# Altium PCB PCB_test_pcb_2_2026-10-20.pcbdoc
Units mm, origin at the board's own origin, x right, y up, seen from the top; angles counter-clockwise.
Board outline 59.65 x 48.65 mm, 2 copper layers (Top Layer, Bottom Layer); 8 components, 5 nets, 17 pads, 0 vias.
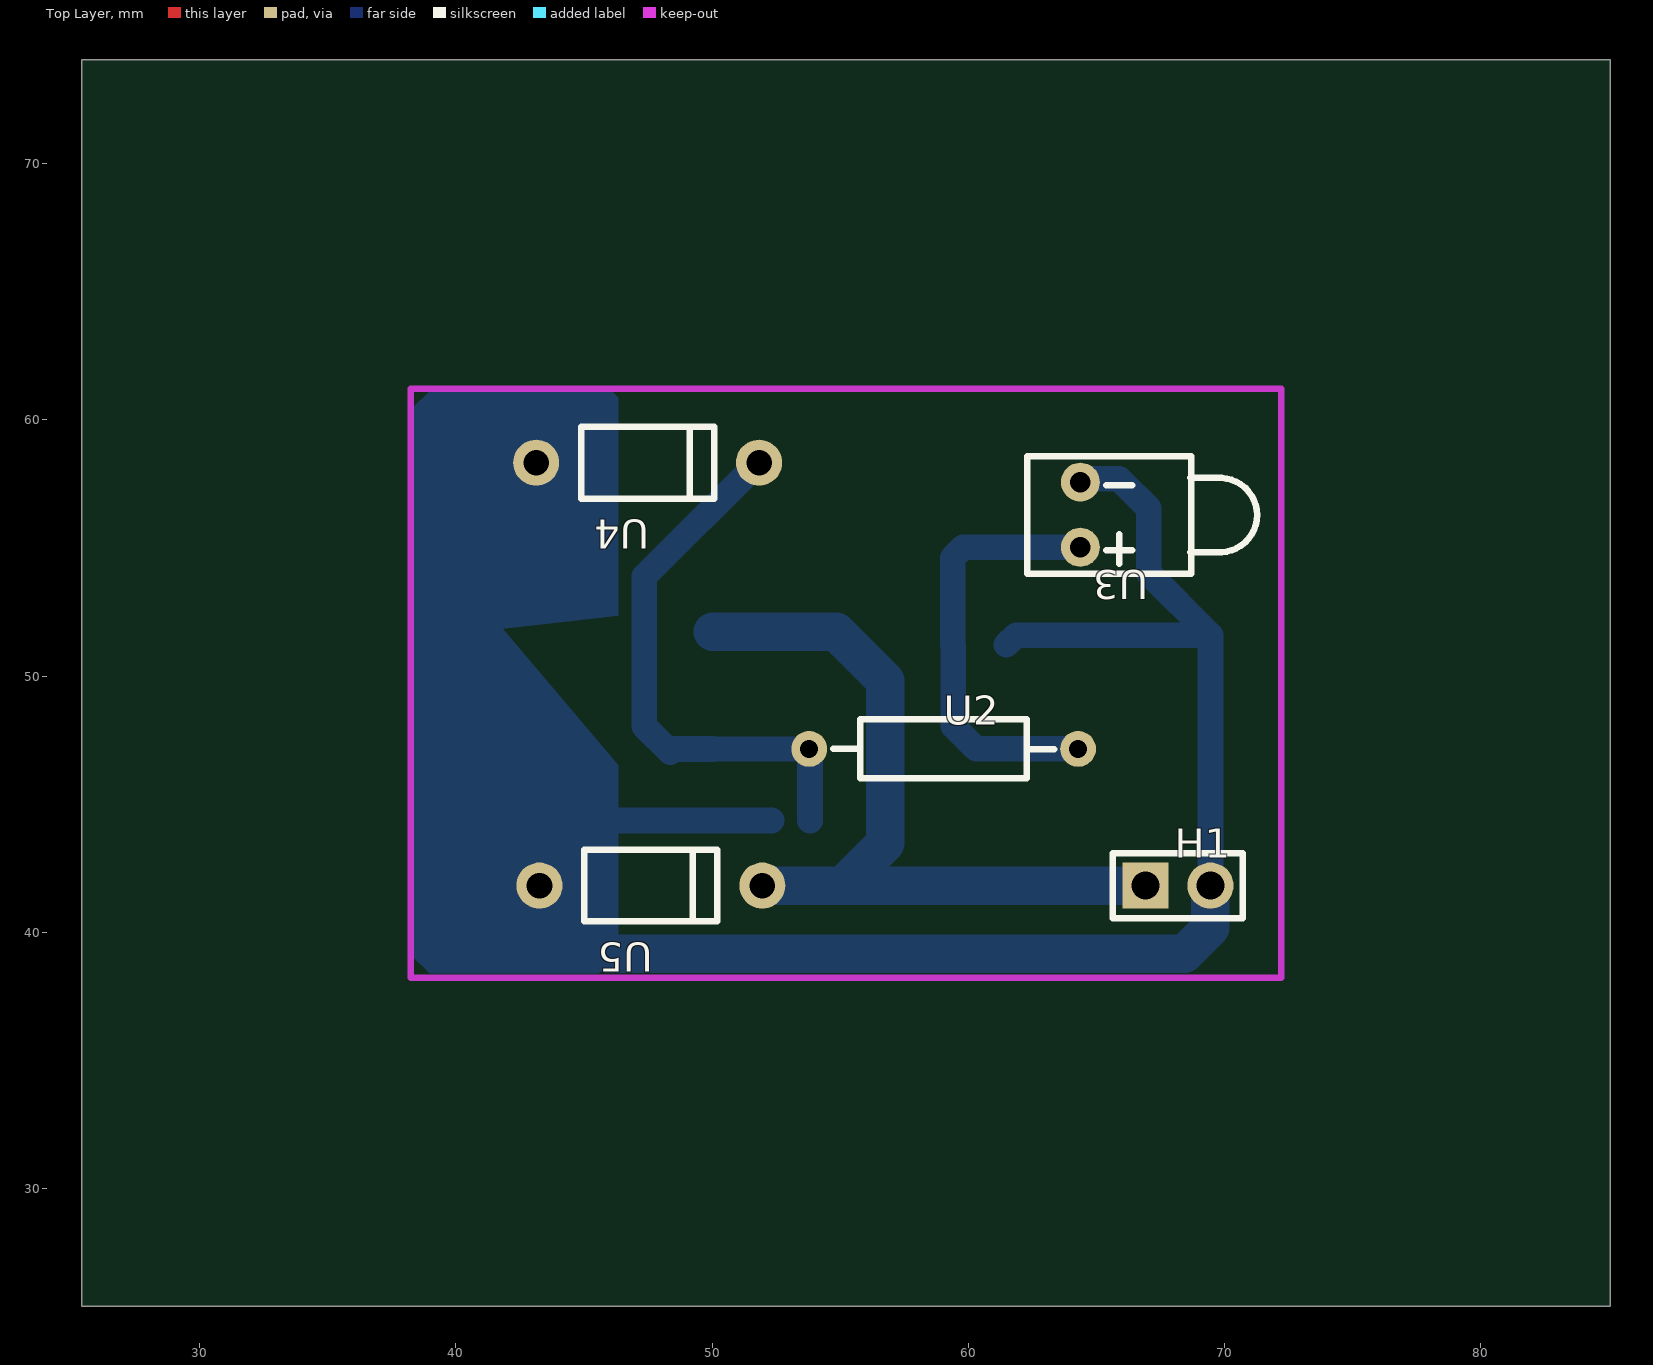
[diagram p0: Top Layer view]
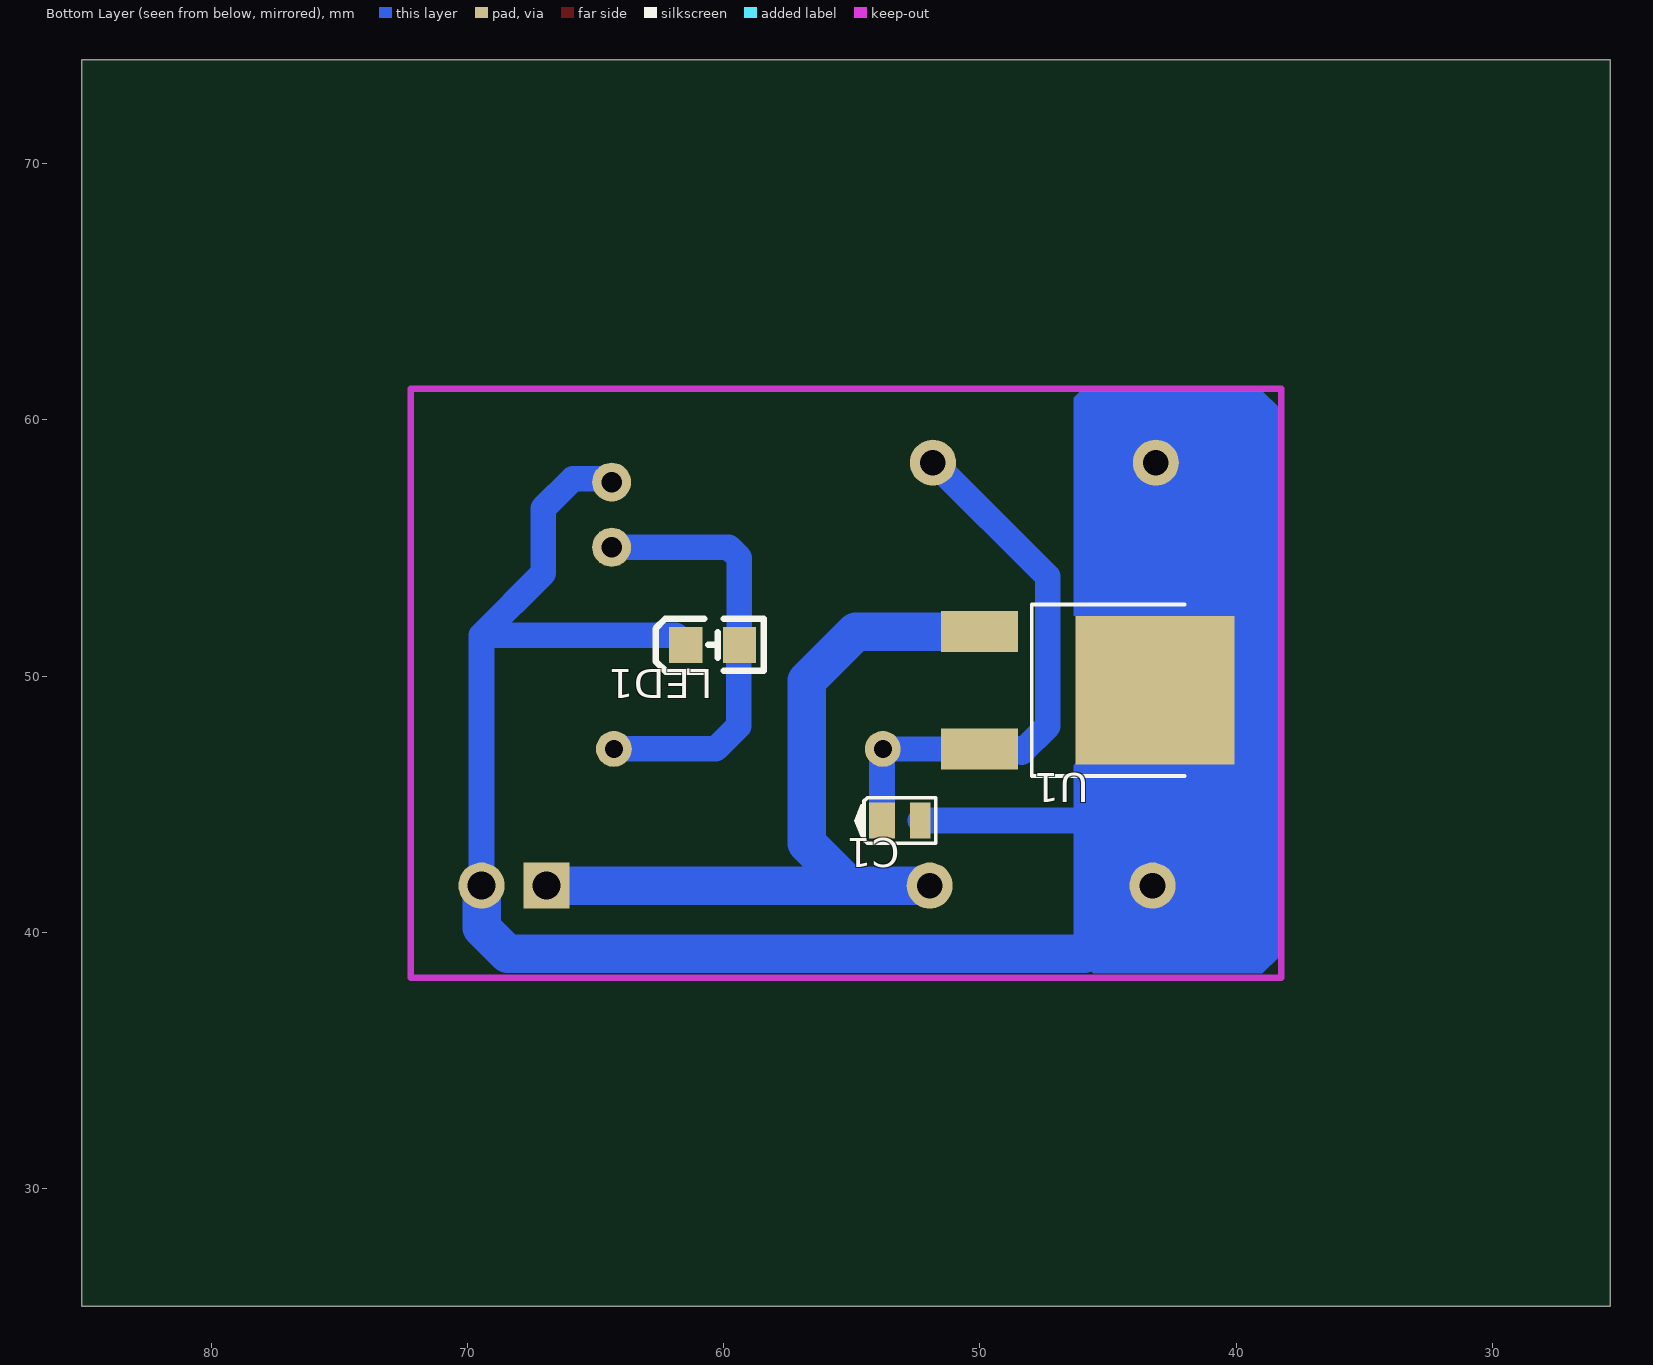
[diagram p1: Bottom Layer view, seen from below]

## Layer stack, top to bottom
Top Layer: signal copper (thickness not stored)
Dielectric: dielectric 0.32, FR-4, Dk 4.8
Bottom Layer: signal copper (thickness not stored)

## Board outline
85.054,25.4 25.4,25.4 25.4,74.054 85.054,74.054

## Components (designator, comment, footprint, x,y, rotation, side; value= is the part's Value field where it differs from the comment)
C1 "100nF" CAP-SMD_L2.2-W1.3-RD 53.071,44.363 r180 bottom
H1 "210S-1*2P L=11.6MMGold-plated black" HDR-TH_2P-P2.54-V-M-1 68.184,41.823 r0 top
LED1 "YLED0805O" LED0805-FD-GREEN 60.437,51.221 r180 bottom
U1 "7805_C19626525" TO-252-2_L6.6-W6.1-P4.57-LS9.9-BR-CW 46.594,49.443 r180 bottom
U2 "330mΩ" RES-TH_BD2.3-L6.5-P10.50-D0.5 59.04,47.157 r0 top
U3 "LED05-红灯" LED-TH_LED-3MM_RED 64.374,56.301 r180 top
U4 "1N4007A" DO-41_BD2.4-L4.7-P8.70-D0.9-RD 47.483,58.333 r180 top
U5 "1N4007A" DO-41_BD2.4-L4.7-P8.70-D0.9-RD 47.61,41.823 r180 top

## Footprints (in the part's own frame and the unit in brackets; to place one, negate y for a bottom-side part, rotate by r counter-clockwise, add the part's x,y. Pads: shape width x height; smd on the part's side, far side on the other; paste and mask are expansions set on the pad)
CAP-SMD_L2.2-W1.3-RD [mm]
  rect 0.8x1.4 smd paste+0 mask+0.05: 1(0.75,0)
  rect 1x1.4 smd paste+0 mask+0.05: 2(-0.75,0)
  silkscreen extent -1.83,-0.89 1.35,0.89
DO-41_BD2.4-L4.7-P8.70-D0.9-RD [mm]
  round 1.8 hole 1 paste+0 mask+0.051: 1(-4.35,0) 2(4.35,0)
  silkscreen extent -2.6,-1.4 2.6,1.4
HDR-TH_2P-P2.54-V-M-1 [mm]
  rect 1.8x1.8 hole 1.1 paste+0 mask+0.051: 1(-1.27,0)
  round 1.8 hole 1.1 paste+0 mask+0.051: 2(1.27,0)
  silkscreen extent -2.54,-1.27 2.54,1.27
LED0805-FD-GREEN [mm]
  rect 1.3x1.4 smd paste+0 mask+0.051: 1(1.05,0) 2(-1.05,0)
  silkscreen extent -2.22,-1.04 1.99,1.01
LED-TH_LED-3MM_RED [mil]
  round 60 hole 31.5 paste+0 mask+1.97: 1(0,50) 2(0,-50)
  silkscreen extent -272,-90 82,91
RES-TH_BD2.3-L6.5-P10.50-D0.5 [mm]
  round 1.4 hole 0.7 paste+0 mask+0.051: 1(-5.25,0) 2(5.25,0)
  silkscreen extent -4.32,-1.15 4.32,1.15
TO-252-2_L6.6-W6.1-P4.57-LS9.9-BR-CW [mm]
  rect 3x1.6 smd paste+0 mask+0.051: 1(-3.424,2.29) 3(-3.424,-2.29)
  rect 6.2x5.8 smd paste+0 mask+0.051: 2(3.424,0)
  silkscreen extent -1.38,-3.35 4.58,3.35

## Nets (pads, with @x,y where several pads share a name; then routed paths per layer and width w, separated by ;. In a path a pad name is that pad's centre, name@x,y a point inside that pad or via, vN(x,y) a via of type N, cw(c..) or ccw(c..) an arc to the next point about the centre after c; other vN are vias at no path point)
5V: C1.2 U1.3 U2.1 U4.1 | length 21.9
  Bottom Layer w1: U4.1 51.801,58.333 47.356,53.888 47.356,48.046 48.372,47.03 48.495,47.153 U1.3 U2.1 53.821,47.126 C1.2
12V: H1.1 U1.1 U5.1 | length 34.3
  Bottom Layer w1.5: U1.1@50.018,51.734 54.844,51.734 56.754,49.824 56.754,43.474 55.103,41.823 U5.1 ; U5.1 H1.1
GND: C1.1 H1.2 LED1.2 U1.2 U3.2 U4.2 U5.2 | length 66.5
  Bottom Layer w1: U5.2@43.26,41.823 45.8,44.363 C1.1 ; LED1.2 61.868,51.602 69.454,51.602 ; U3.2 64.501,57.698 65.898,57.698 67.041,56.555 67.041,54.015 69.454,51.602 ; H1.2 69.454,51.602
  Bottom Layer w1.5: U5.2 45.926,39.156 68.438,39.156 69.454,40.172 H1.2
LED1_1: LED1.1 U2.2 U3.1 | length 17
  Bottom Layer w1: LED1.1 59.387,54.616 59.802,55.031 U3.1 ; LED1.1 59.421,51.186 59.421,48.046 60.31,47.157 U2.2
U1_2:  | length 5.5
  Bottom Layer w1.5: 43.8,39.537 43.26,40.077 43.26,41.823 43.26,40.712 44.562,39.41

## Other copper
Bottom Layer:
  region net GND: 46.34,52.364 46.34,60.873 46.086,61.127 38.974,61.127 38.339,60.492 38.339,51.348 39.355,51.348 39.609,51.602
  region net GND: 46.34,46.522 46.34,39.156 45.578,38.394 38.974,38.394 38.339,39.029 38.339,54.015 39.228,54.904